# Altium PCB PCB8.PcbDoc (part 1 of 2)
Units mm, origin at the board's own origin, x right, y up, seen from the top; angles counter-clockwise.
Board outline 100 x 100 mm, 2 copper layers (Top Layer, Bottom Layer); 151 components, 157 nets, 624 pads, 195 vias.
Unrouted connection lines stored in the file: 31.
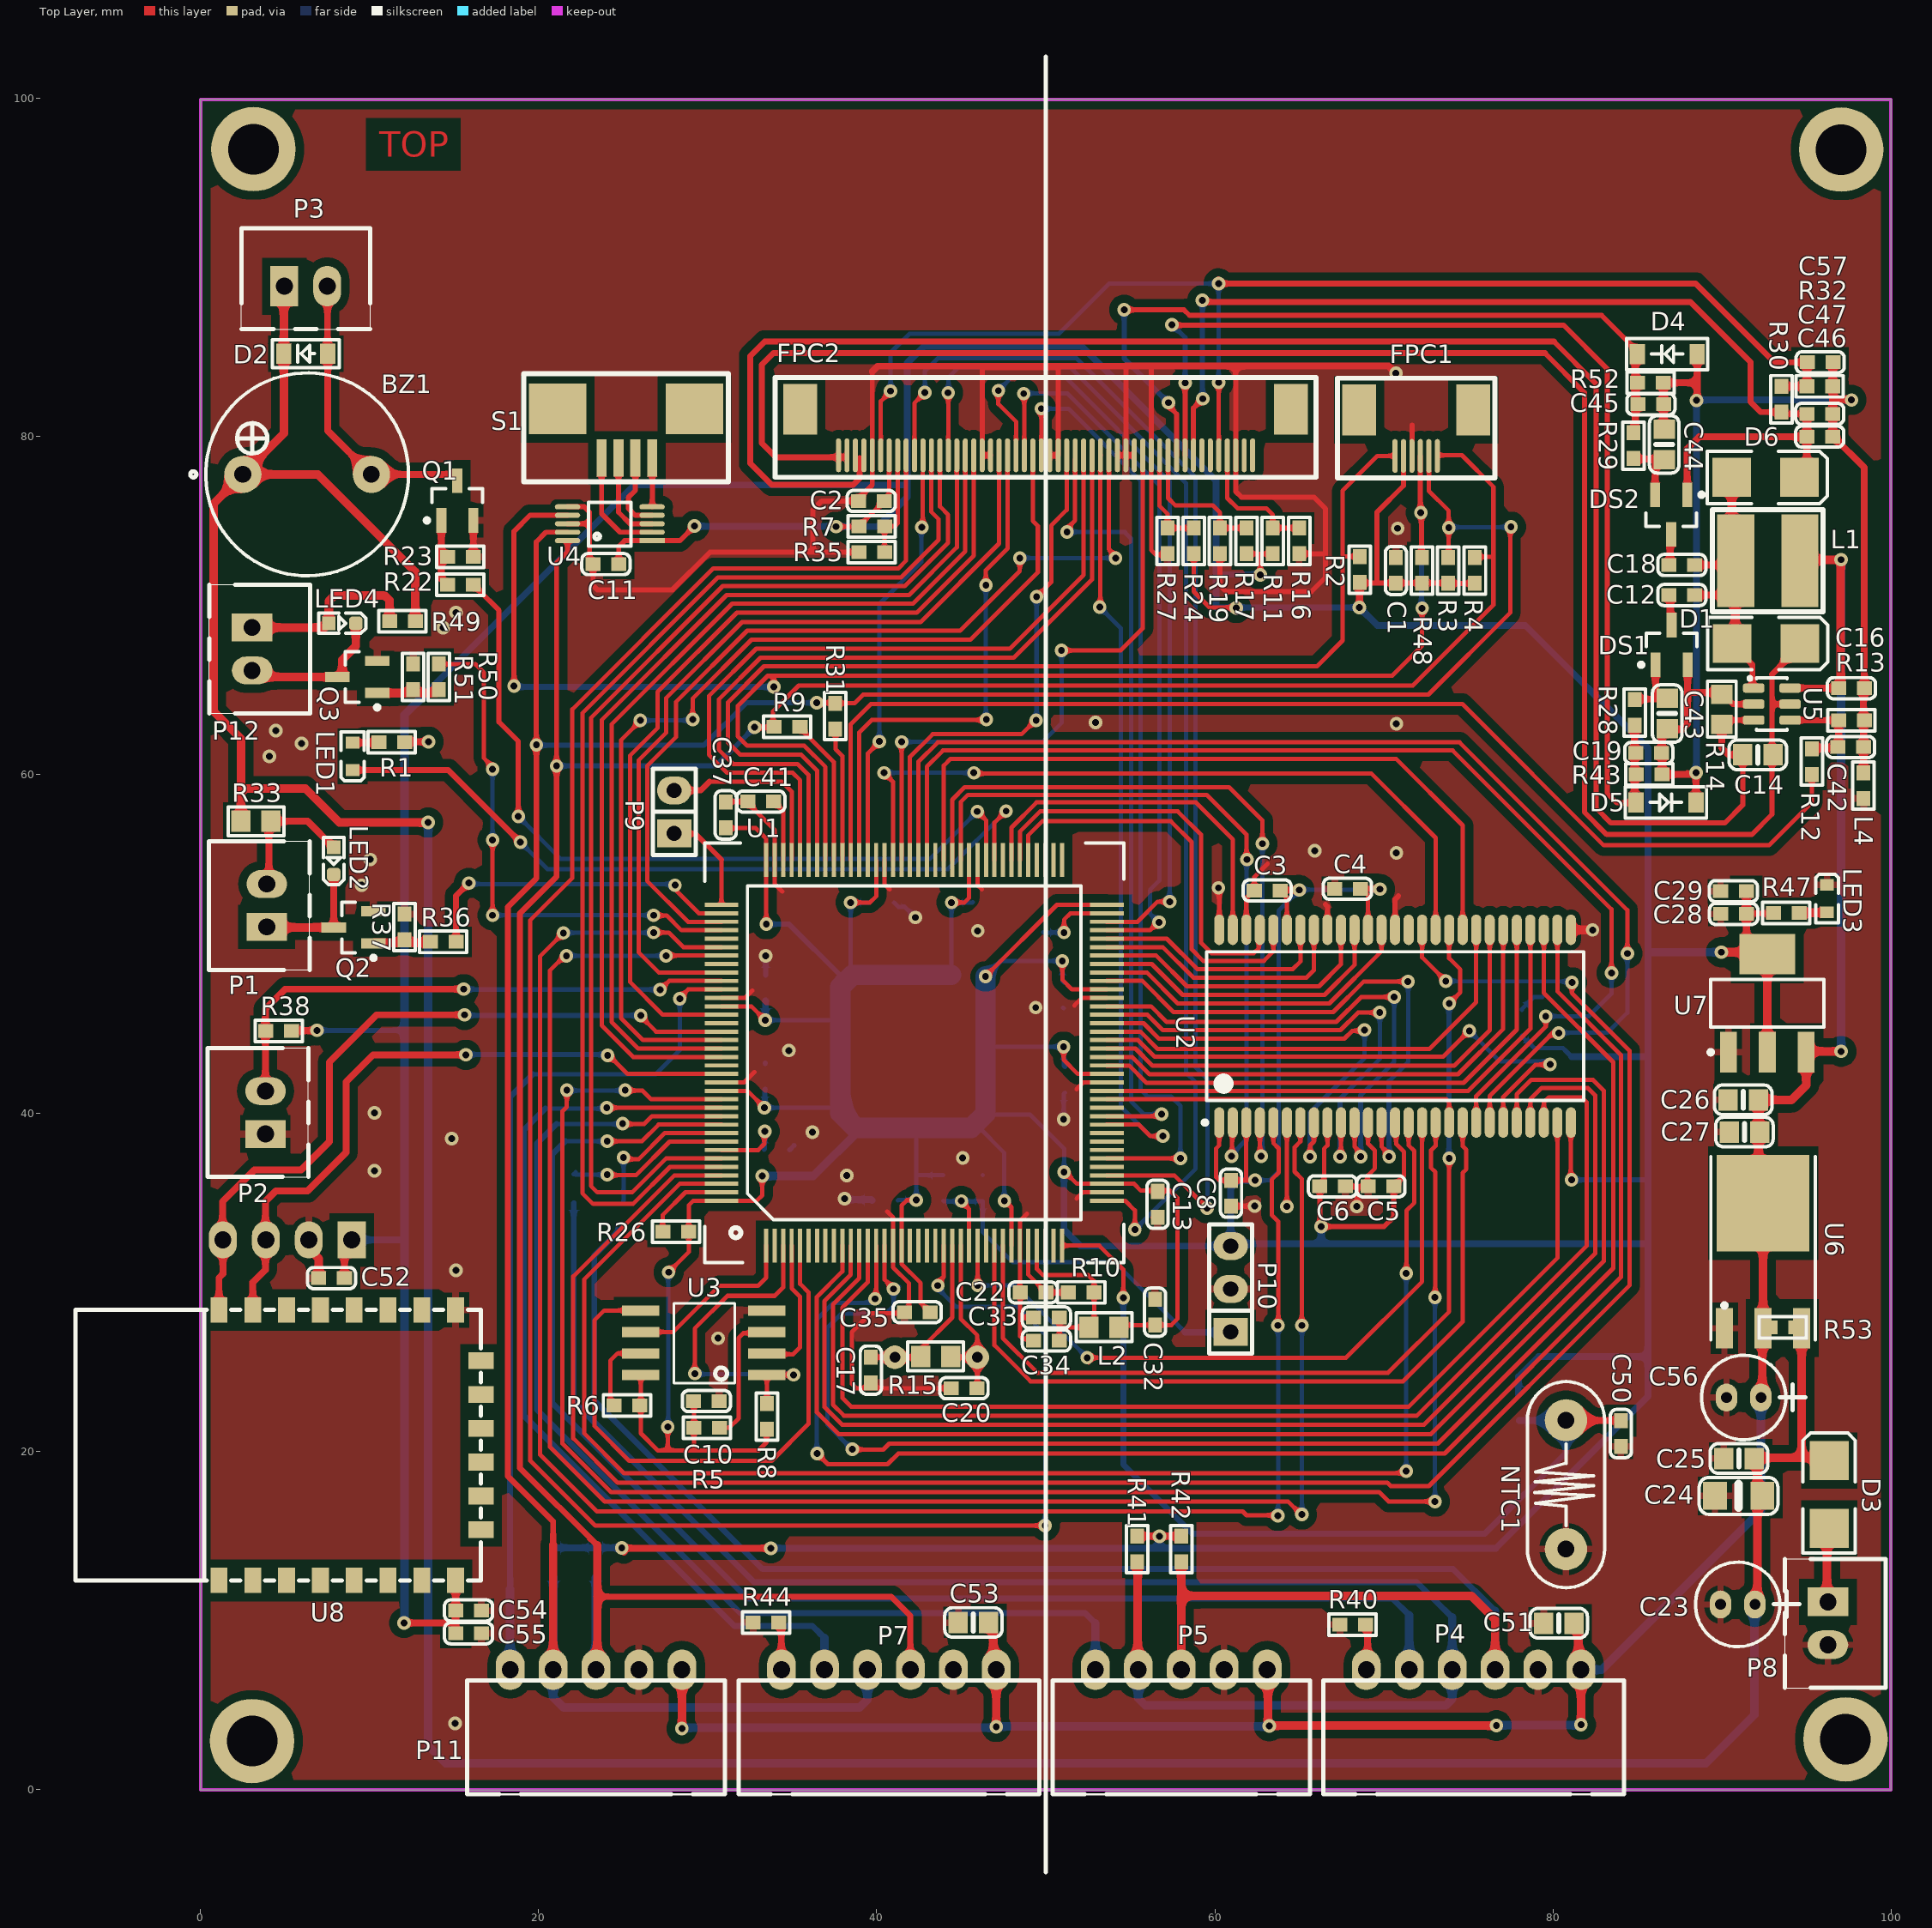
[diagram p0: Top Layer view]
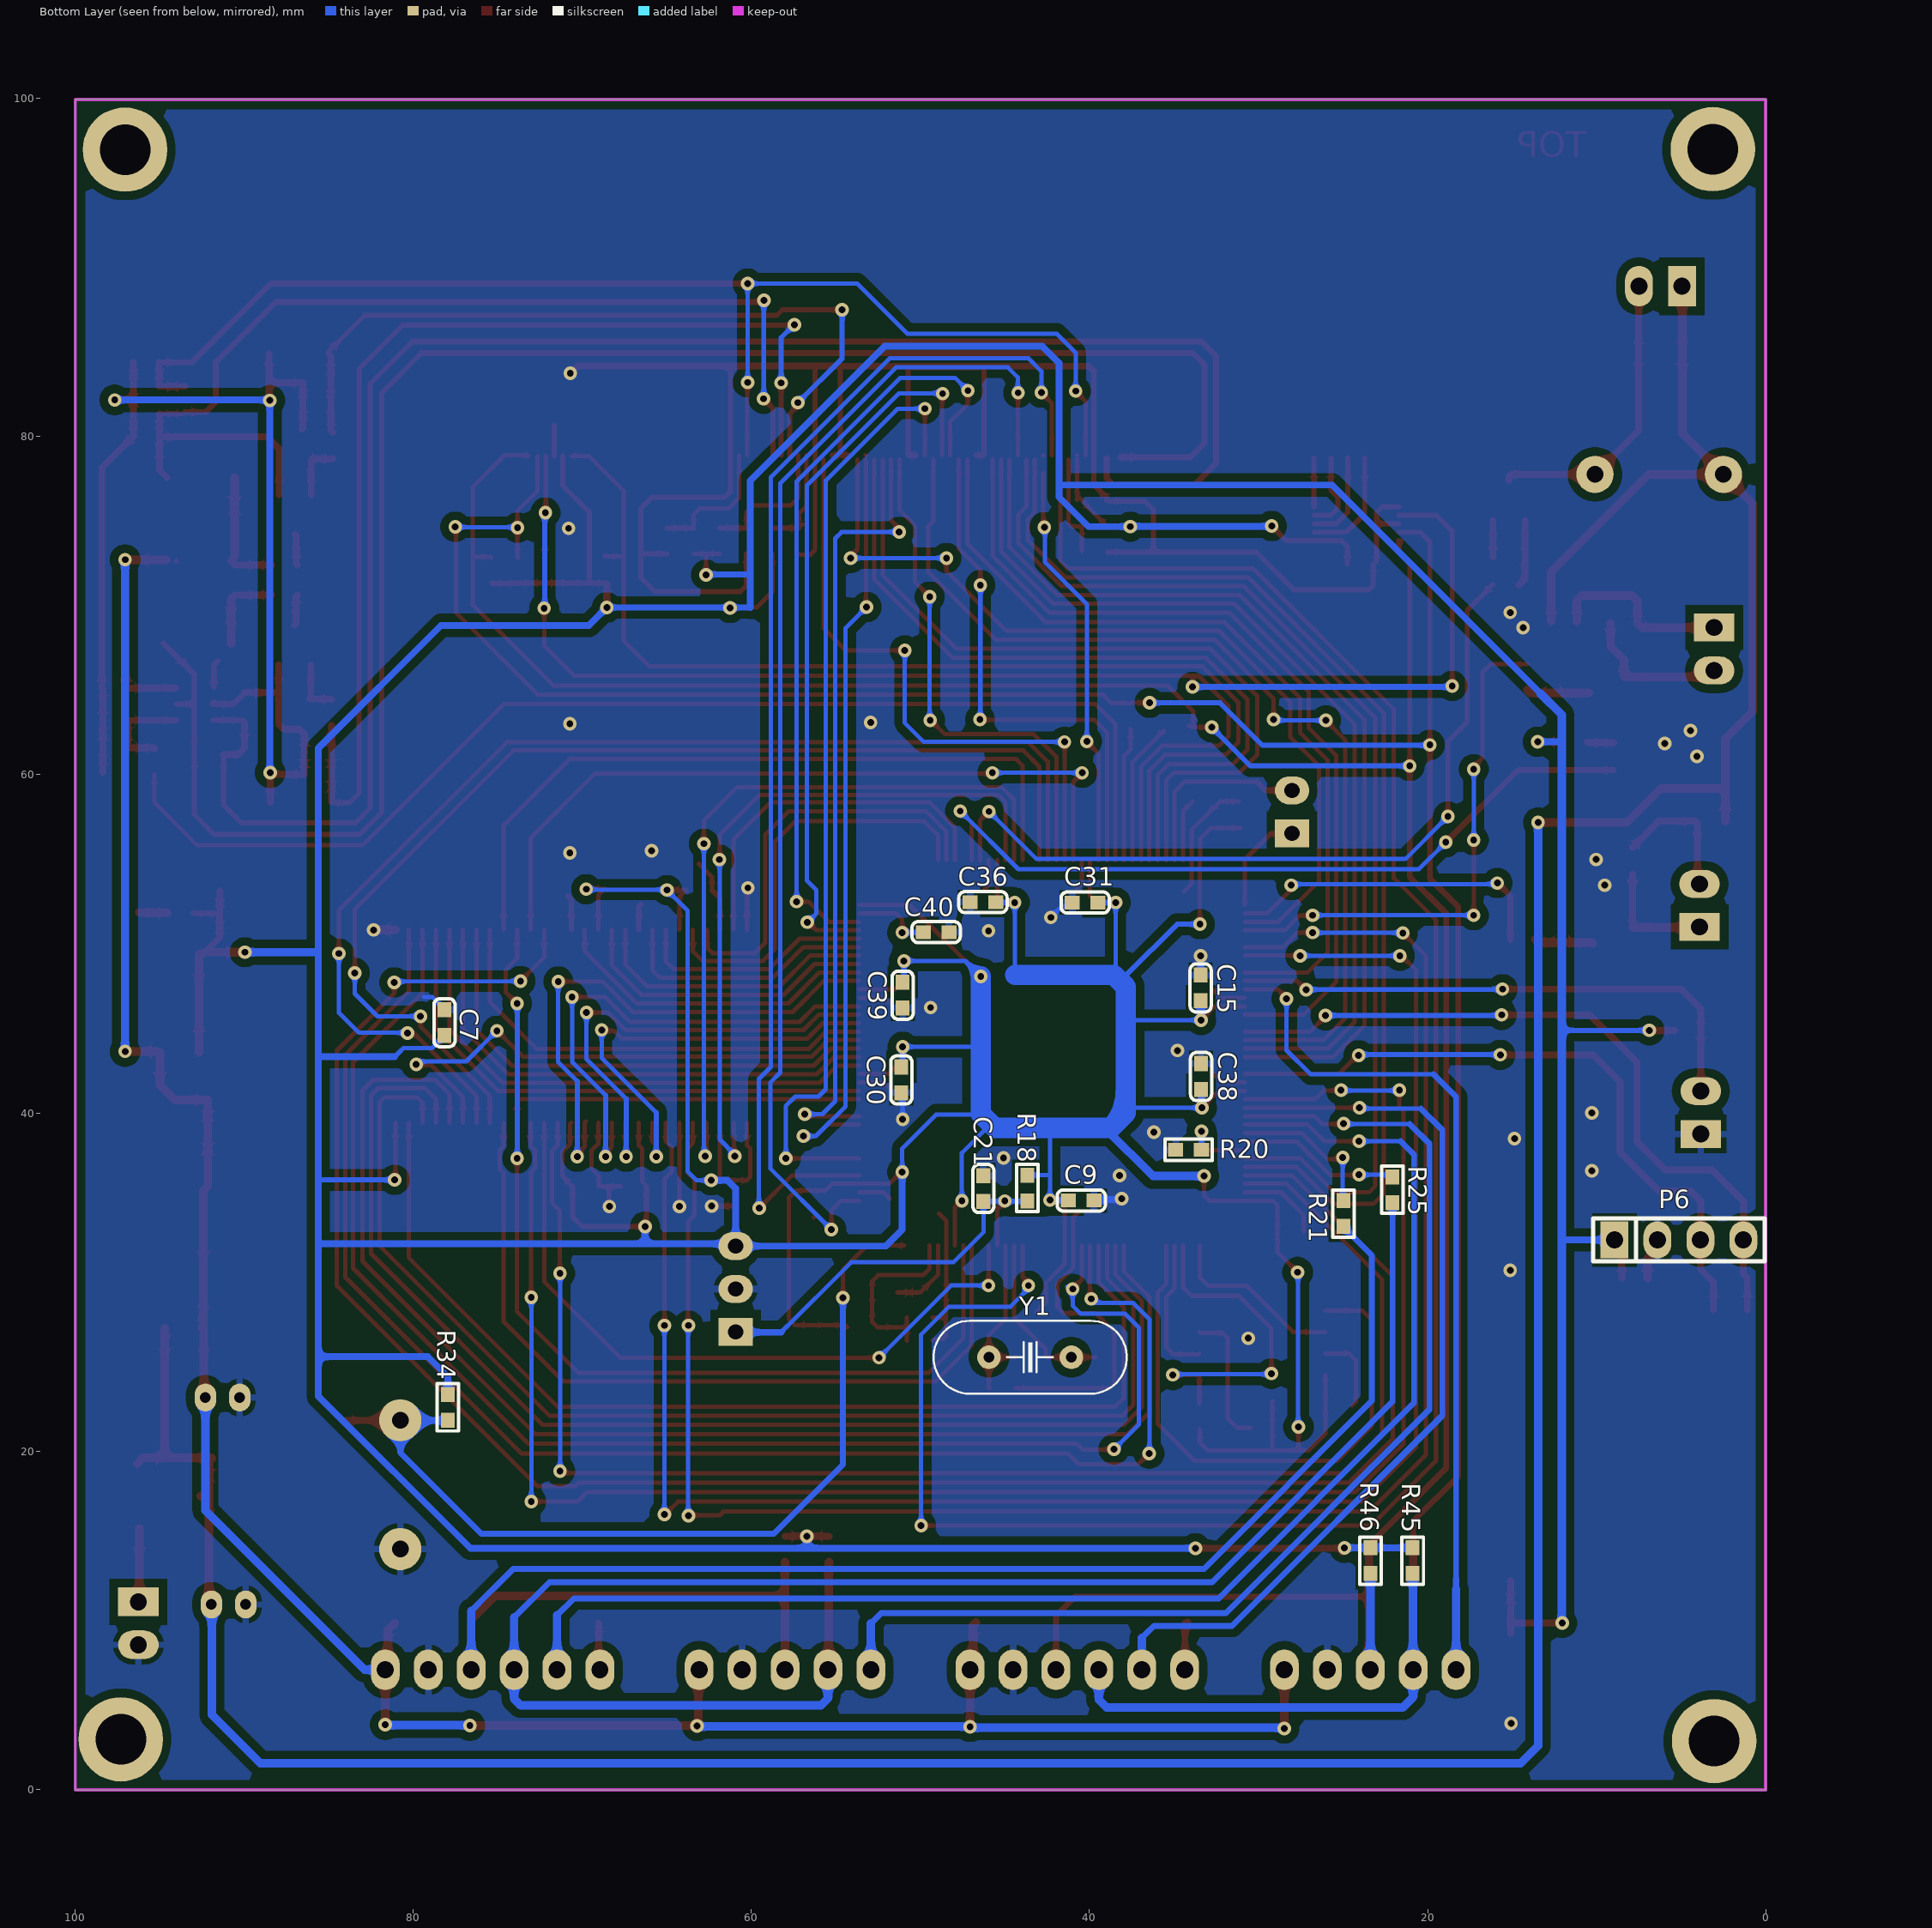
[diagram p1: Bottom Layer view, seen from below]
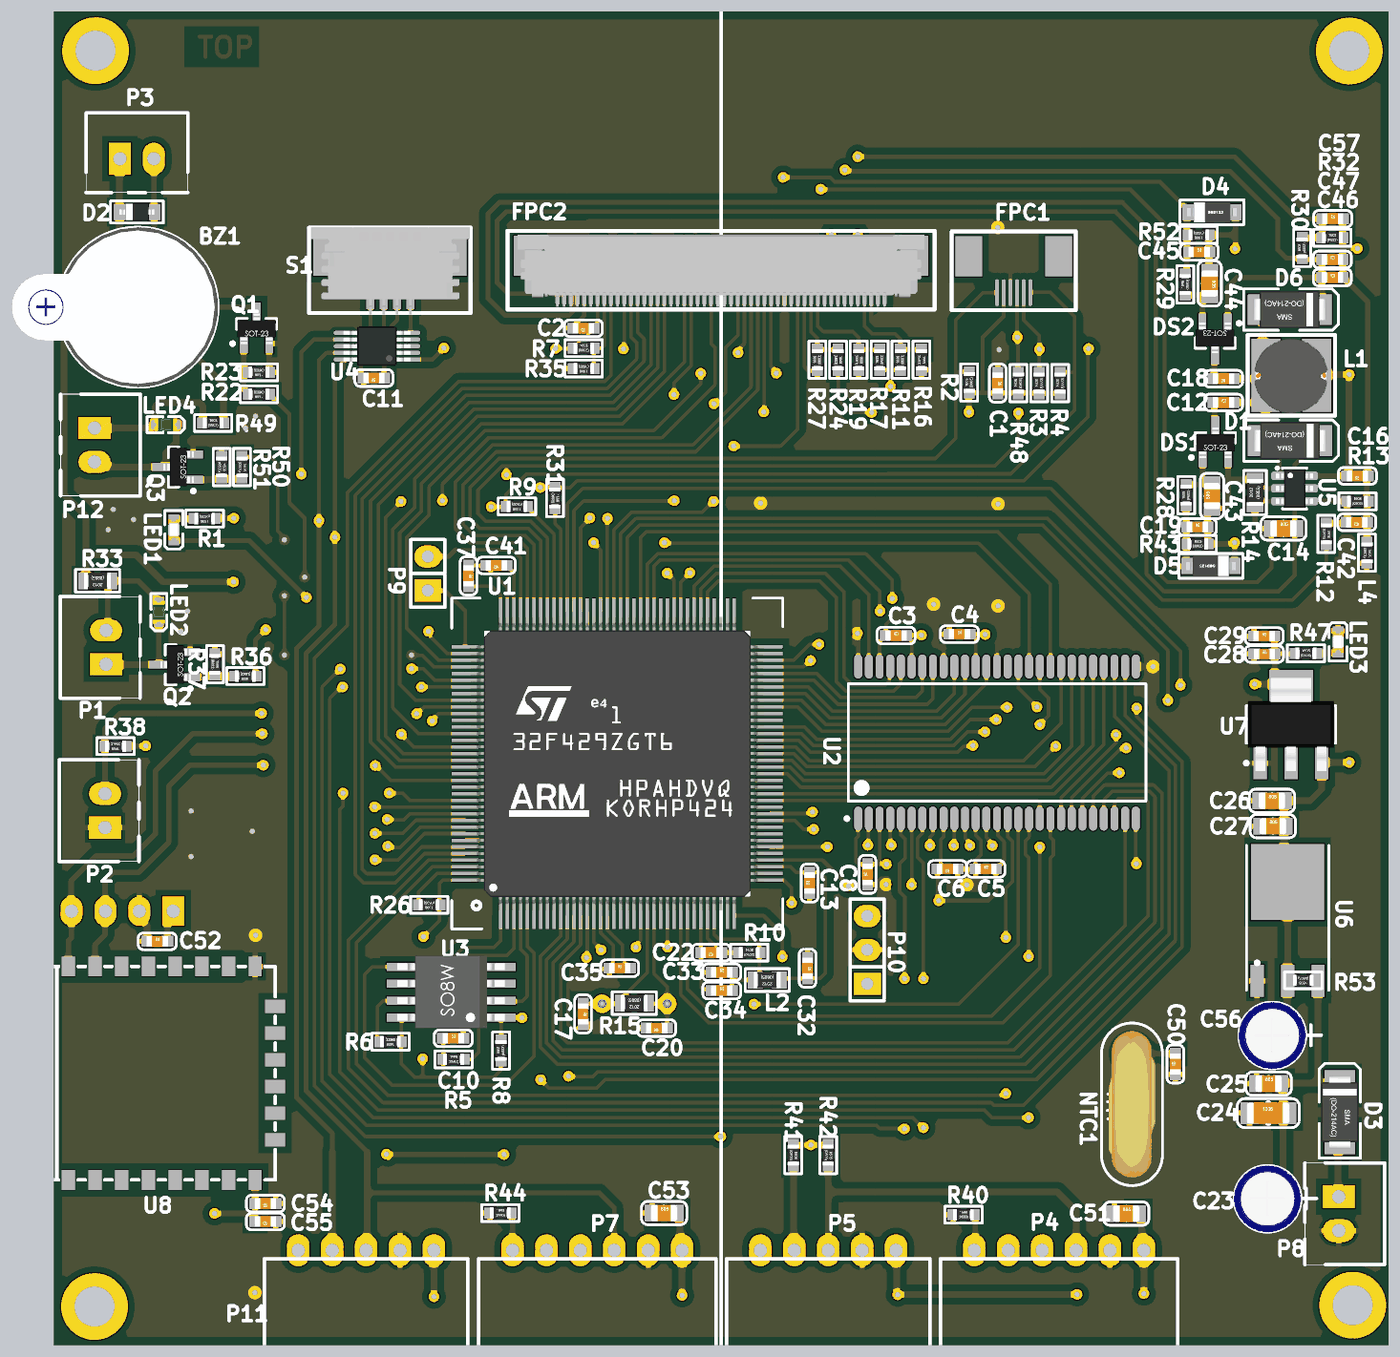
[diagram p3: 3D render of the assembled board from above, using the file's embedded part models]
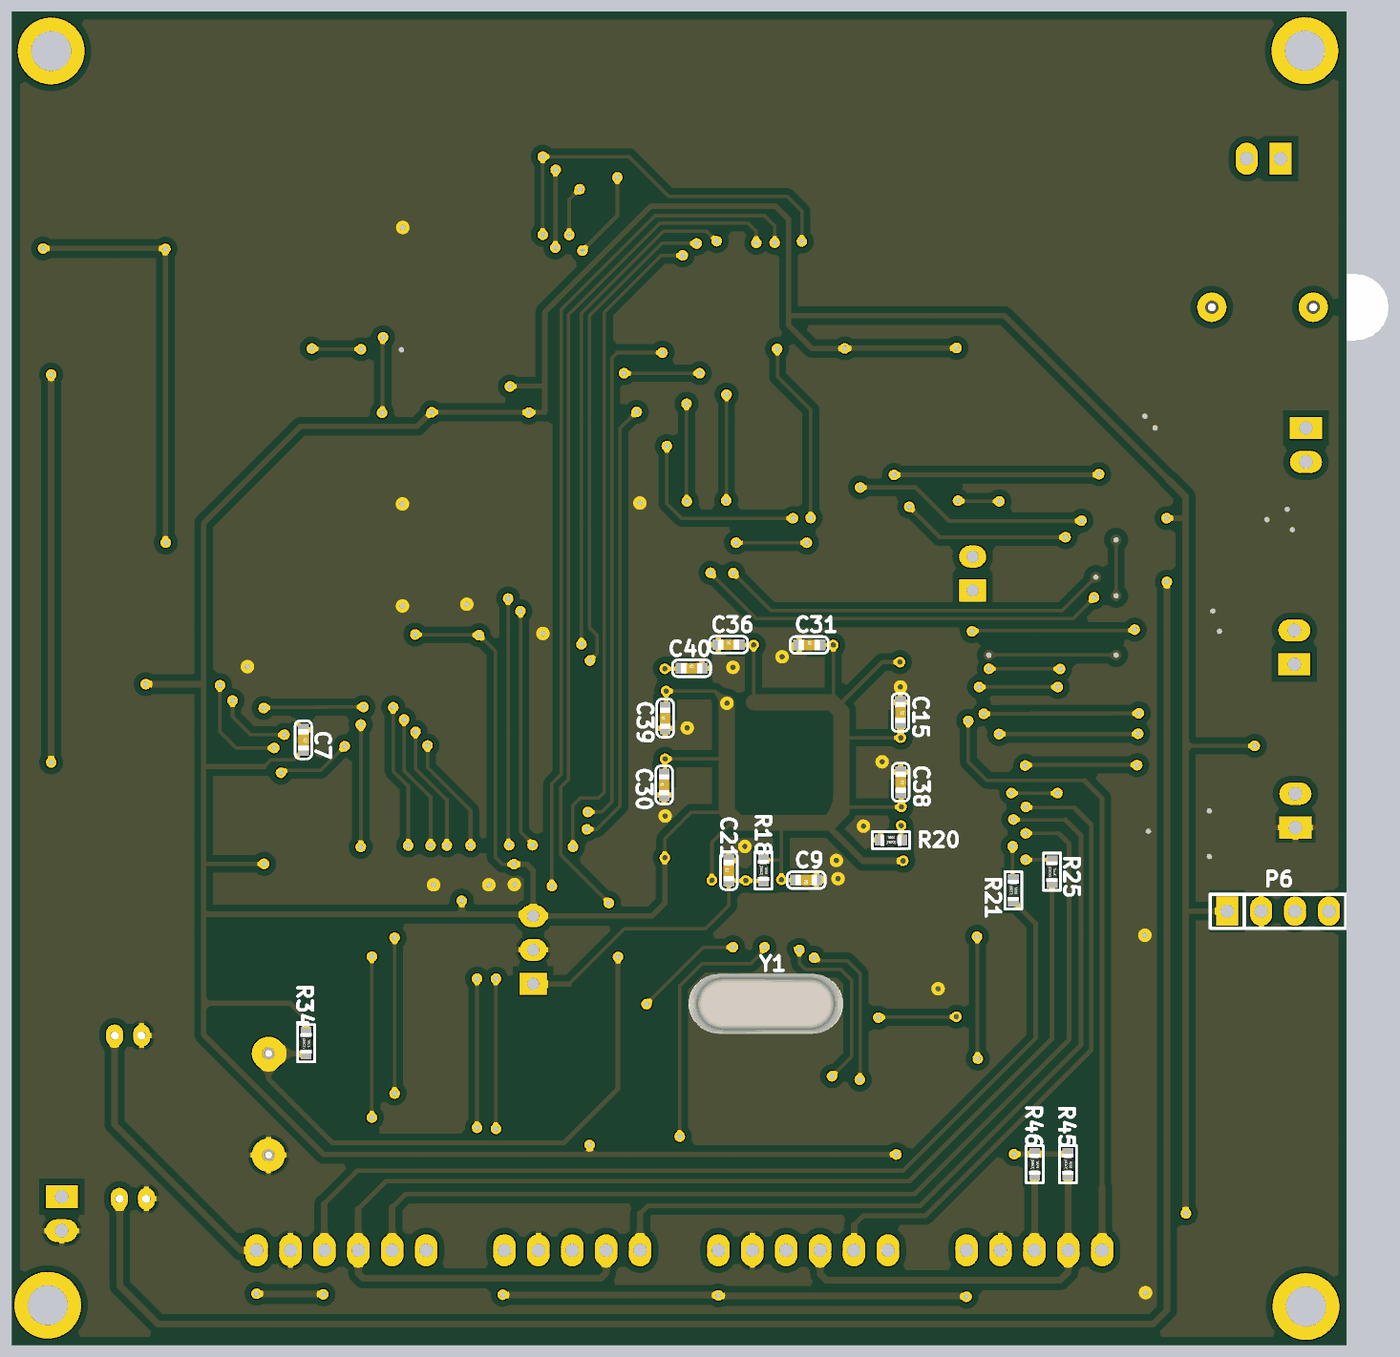
[diagram p4: 3D render of the assembled board from below, using the file's embedded part models]

## Layer stack, top to bottom
Top Solder: solder mask 0.0102, Solder Resist, Dk 3.5
Top Layer: signal copper 0.0356
Dielectric 1: dielectric 0.32, FR-4, Dk 4.8
Bottom Layer: signal copper 0.0356
Bottom Solder: solder mask 0.0102, Solder Resist, Dk 3.5

## Board outline
0,-0.051 100,-0.051 100,99.949 0,99.949

## Design rules (kind name [scope] priority, off if disabled: settings)
BoardOutlineClearance [All] p1: gap=0.5 ignorepadtopadclearanceinfootprint=FALSE
Clearance Clearance_1 [inpoly] p1: gap=0.5 ignorepadtopadclearanceinfootprint=FALSE
Clearance [All] p2: gap=0.2 ignorepadtopadclearanceinfootprint=FALSE
HoleSize [All] p1: absolutevalues=TRUE maxlimit=3 minlimit=0.025 maxpercent=80.000 minpercent=20.000
MinimumSolderMaskSliver [All] p1: minsoldermaskwidth=0.1
PolygonConnect [All] p1: thpad.connectstyle=Relief thpad.reliefconductorwidth=0.4 thpad.reliefentries=4 thpad.polygonreliefangle="90 Angle" thpad.airgapwidth=0.3 smdpad.connectstyle=Relief smdpad.reliefconductorwidth=0.4 smdpad.reliefentries=4 smdpad.polygonreliefangle="90 Angle" smdpad.airgapwidth=0.3 via.connectstyle=Direct via.reliefconductorwidth=0.254 via.reliefentries=4 via.polygonreliefangle="90 Angle" via.airgapwidth=0.254
RoutingVias [All] p1: holewidth=0.5 width=1 viastyle="Through Hole" minholewidth=0.3 minwidth=0.6 maxholewidth=0.711 maxwidth=1.27
SilkToSilkClearance [All] p1: silktosilkclearance=0
SilkToSolderMaskClearance [IsPad] p1: minsilkscreentomaskgap=0 clearancetoexposedcopper=TRUE
SolderMaskExpansion [All] p1: expansion=0.102 istentingtop=FALSE
SupplyNets "Schematic Supply Nets_11" [InNet('VREF+')] p1: voltage=0.000
SupplyNets "Schematic Supply Nets_10" [InNet('3V3')] p2: voltage=0.000
SupplyNets "Schematic Supply Nets_9" [InNet('VCOM')] p3: voltage=0.000
SupplyNets "Schematic Supply Nets_8" [InNet('12V')] p4: voltage=0.000
SupplyNets "Schematic Supply Nets_7" [InNet('VGL')] p5: voltage=0.000
SupplyNets "Schematic Supply Nets_5" [InNet('VGH')] p6: voltage=0.000
SupplyNets "Schematic Supply Nets_4" [InNet('+5V')] p7: voltage=0.000
SupplyNets "Schematic Supply Nets_3" [InNet('BGND')] p8: voltage=0.000
SupplyNets "Schematic Supply Nets_2" [InNet('GND')] p9: voltage=0.000
SupplyNets "Schematic Supply Nets_1" [InNet('VDDA')] p10: voltage=0.000
SupplyNets "Schematic Supply Nets" [InNet('AVDD')] p11: voltage=0.000
Width [All] p1: maxlimit=2 minlimit=0.254 preferedwidth=0.5 minimp=50.000000 maximp=50.000000 favimp=50.000000
26 further rules are at their usual default settings.

## Components (designator, comment, footprint, x,y, rotation, side; value= is the part's Value field where it differs from the comment)
BZ1 "Buzzer" "Buzzer 3M" 6.299,77.768 r90 top
C1 "100nF" "0603 Capacitor" 70.714,72.078 r270 top
C2 "4.7uF" "0603 Capacitor" 39.675,76.193 r180 top
C3 "100nF" "0603 Capacitor" 63.094,53.155 r0 top
C4 "100nF" "0603 Capacitor" 67.843,53.257 r0 top
C5 "100nF" "0603 Capacitor" 69.825,35.655 r0 top
C6 "100nF" "0603 Capacitor" 66.954,35.655 r180 top
C7 "100nF" "0603 Capacitor" 78.156,45.332 r270 bottom
C8 "100nF" "0603 Capacitor" 60.96,35.248 r90 top
C9 "100nF" "0603 Capacitor" 40.488,34.816 r0 bottom
C10 "100nF" "0603 Capacitor" 29.921,22.955 r0 top
C11 "100nF" "0603 Capacitor" 23.978,72.459 r180 top
C12 "100nF" "0603 Capacitor" 87.63,70.63 r0 top
C13 "100nF" "0603 Capacitor" 56.617,34.595 r90 top
C14 "2.2uF" "0805 Capacitor" 92.126,61.182 r0 top
C15 "100nF" "0603 Capacitor" 33.426,47.389 r270 bottom
C16 "4.7uF" "0603 Capacitor" 97.663,65.119 r180 top
C17 "22pF" "0603 Capacitor" 39.649,24.783 r270 top
C18 "100nF" "0603 Capacitor" 87.63,72.408 r180 top
C19 "100nF" "0603 Capacitor" 85.674,61.29 r0 top
C20 "22pF" "0603 Capacitor" 45.161,23.717 r180 top
C21 "100nF" "0603 Capacitor" 46.279,35.528 r90 bottom
C22 "100nF" "0603 Capacitor" 49.251,29.381 r180 top
C23 "220uf/16v" $CAP-RB-80MIL-D5MM 90.932,10.922 r180 top
C24 "10uF" "1206 Capacitor" 90.983,17.348 r0 top
C25 "100nF" "0805 Capacitor" 91.008,19.558 r0 top
C26 "10uF" "0805 Capacitor" 91.262,40.767 r0 top
C27 "100nF" "0805 Capacitor" 91.327,38.862 r0 top
C28 "10uF" "0603 Capacitor" 90.692,51.765 r0 top
C29 "100nF" "0603 Capacitor" 90.678,53.111 r0 top
C30 "100nF" "0603 Capacitor" 51.13,41.954 r90 bottom
C31 "100nF" "0603 Capacitor" 40.259,52.444 r180 bottom
C32 "100nF" "0603 Capacitor" 56.464,28.212 r270 top
C33 "100nF" "0603 Capacitor" 50.038,27.908 r0 top
C34 "1uF" "0603 Capacitor" 50.038,26.536 r0 top
C35 "100nF" "0603 Capacitor" 42.393,28.212 r0 top
C36 "100nF" "0603 Capacitor" 46.304,52.469 r180 bottom
C37 "100nF" "0603 Capacitor" 31.064,57.626 r270 top
C38 "100nF" "0603 Capacitor" 33.401,42.157 r270 bottom
C39 "100nF" "0603 Capacitor" 51.054,46.958 r90 bottom
C40 "2.2uF" "0603 Capacitor" 49.073,50.691 r180 bottom
C41 "2.2uF" "0603 Capacitor" 33.147,58.413 r180 top
C42 "NC|82nF" "0603 Capacitor" 97.612,61.639 r180 top value=NC|82nF
C43 "1uF" "0805 Capacitor" 86.766,63.616 r90 top
C44 "1uF" "0805 Capacitor" 86.589,79.546 r270 top
C45 "100nF" "0603 Capacitor" 85.801,81.915 r0 top
C46 "2.2uF" "0603 Capacitor" 95.783,80.003 r0 top
C47 "100nF" "0603 Capacitor" 95.783,81.349 r0 top
C50 "100nF" "0603 Capacitor" 84.023,21.031 r90 top
C51 "10uF" "0805 Capacitor" 80.34,9.814 r0 top
C52 "100nF" "0603 Capacitor" 7.747,30.226 r0 top
C53 "10uF" "0805 Capacitor" 45.72,9.855 r0 top
C54 "100nF" "0603 Capacitor" 15.85,10.566 r180 top
C55 "10uF" "0603 Capacitor" 15.85,9.22 r180 top
C56 "220uf/16v" $CAP-RB-80MIL-D5MM 91.288,23.165 r180 top
C57 "100nF" "0603 Capacitor" 95.809,84.397 r0 top
D1 "1N5819" DO-214AC(SMA) 92.608,67.76 r270 top
D2 "1N4148" SOD-323 6.223,84.905 r0 top
D3 "1N5819" DO-214AC(SMA) 96.342,17.424 r0 top
D4 "Zener 16.8V" SOD-123 86.763,84.887 r0 top
D5 "Zener 6.8V" SOD-123 86.69,58.369 r180 top
D6 "1N5819" DO-214AC(SMA) 92.583,77.59 r270 top
DS1 "BAT54S" SOT-23 87.02,67.677 r0 top
DS2 "BAT54S" SOT-23 86.995,75.387 r180 top
FPC1 "FPC 6 Pin 0.5mm Pitch" "FPC 6 Pin 0.5mm Pitch" 71.912,80.217 r0 top
FPC2 "FPC 50 Pin 0.5 mm Pitch" "FPC 50 Pin 0.5 mm Top Contact" 49.987,80.257 r0 top locked
L1 "4.7uH/1.5A/DCR<0.1R/CD54" CD54 92.71,72.662 r180 top
L2 "10uH" "0805 Resistor" 53.442,27.323 r180 top
L4 "10uH" "0603 Resistor" 98.374,59.353 r270 top
LED1 "SMD LED" "LED_0603 W" 8.992,61.087 r270 top
LED2 "5mm" LED0603 7.874,54.902 r270 top
LED3 "SMD LED" "LED_0603 W" 96.215,52.68 r90 top
LED4 "5mm" LED0603 8.382,68.961 r0 top
NTC1 "50R" "$RES-NTC-POWER 15mm" 80.772,18.009 r90 top
P1 "J2" "$xh-2pin male-L"#1 3.912,50.996 r90 top
P2 "J2" "$xh-2pin male-L"#1 3.835,38.753 r90 top
P3 "J2" "$xh-2pin male-L"#1 4.953,88.9 r0 top
P4 "Header 6" "$xh-6pin male-H" 68.961,7.061 r0 top
P5 "Header 5" "$xh-5pin male-H" 52.934,7.061 r0 top
P6 "PL2303" $Header4Female 8.941,32.487 r180 bottom
P7 "Header 6" "$xh-6pin male-H" 34.366,7.061 r0 top
P8 "J2" "$xh-2pin male-L"#2 96.266,11.074 r270 top
P9 "J2" $HEADER2FEMALE 28.016,56.533 r90 top
P10 "J3" $HEADER3FEMALE 60.935,27.044 r90 top
P11 "Header 5" "$xh-5pin male-H" 18.313,7.061 r0 top
P12 "J2" "$xh-2pin male-L"#1 3.048,68.707 r270 top
Q1 "PMBT3904" SOT-23 15.189,76.218 r0 top
Q2 "PMBT3904" SOT-23 9.049,50.971 r90 top
Q3 "PMBT3904" SOT-23 9.271,65.786 r90 top
R1 "470" "0603 Resistor" 11.303,61.925 r180 top
R2 "4.7K" "0603 Resistor" 68.58,72.129 r90 top
R3 "4.7K" "0603 Resistor" 73.812,72.078 r90 top
R4 "4.7K" "0603 Resistor" 75.387,72.078 r90 top
R5 "4.7K" "0603 Resistor" 29.947,21.38 r0 top
R6 "4.7K" "0603 Resistor" 25.222,22.701 r180 top
R7 "10K" "0603 Resistor" 39.7,74.694 r0 top
R8 "4.7K" "0603 Resistor" 33.503,22.04 r90 top
R9 "100" "0603 Resistor" 34.696,62.833 r180 top
R10 "47" "0603 Resistor" 52.095,29.381 r0 top
R11 "10K" "0603 Resistor" 63.424,73.831 r90 top
R12 "0|10K" "0603 Resistor" 95.326,60.775 r270 top value=0|10K
R13 "100K" "0603 Resistor" 97.663,63.214 r0 top
R14 "2.7(1.1-5.1)" "0805 Resistor" 89.992,63.874 r90 top
R15 "1M" "0805 Resistor" 43.485,25.596 r180 top
R16 "10K" "0603 Resistor" 64.999,73.831 r270 top
R17 "10K" "0603 Resistor" 61.874,73.831 r90 top
R18 "4.7K" "0603 Resistor" 43.688,35.553 r270 bottom
R19 "10K" "0603 Resistor" 60.3,73.831 r270 top
R20 "10K" "0603 Resistor" 34.138,37.814 r180 bottom
R21 "100" "0603 Resistor" 24.968,34.044 r270 bottom
R22 "4.7K" "0603 Resistor" 15.367,71.247 r180 top
R23 "47K" "0603 Resistor" 15.367,72.891 r180 top
R24 "10K" "0603 Resistor" 58.75,73.831 r270 top
R25 "100" "0603 Resistor" 22.073,35.451 r270 bottom
R26 "10K" "0603 Resistor" 28.118,32.962 r180 top
R27 "10K" "0603 Resistor" 57.201,73.831 r90 top
R28 "1K" "0603 Resistor" 84.836,63.678 r90 top
R29 "1K" "0603 Resistor" 84.76,79.47 r90 top
R30 "4.7K" "0603 Resistor" 93.523,82.213 r90 top
R31 "100" "0603 Resistor" 37.541,63.468 r270 top
R32 "3.3K" "0603 Resistor" 95.783,82.975 r0 top
R33 "680" "0805 Resistor" 3.277,57.252 r180 top
R34 "4.7K" "0603 Resistor" 77.953,22.581 r270 bottom
R35 "10K" "0603 Resistor" 39.7,73.17 r180 top
R36 "4.7K" "0603 Resistor" 14.351,50.114 r180 top
R37 "47K" "0603 Resistor" 12.065,50.996 r270 top
R38 "4.7K" "0603 Resistor" 4.623,44.856 r180 top
R40 "0" "0603 Resistor" 68.148,9.728 r0 top
R41 "4.7K" "0603 Resistor" 55.397,14.199 r270 top
R42 "4.7K" "0603 Resistor" 58.014,14.199 r270 top
R43 "52K" "0603 Resistor" 85.7,60.02 r0 top
R44 "0" "0603 Resistor" 33.45,9.855 r0 top
R45 "4.7K" "0603 Resistor" 20.879,13.513 r270 bottom
R46 "4.7K" "0603 Resistor" 23.368,13.513 r270 bottom
R47 "470" "0603 Resistor" 93.802,51.816 r0 top
R48 "4.7K" "0603 Resistor" 72.263,72.078 r90 top
R49 "680" "0603 Resistor" 11.938,69.088 r0 top
R50 "4.7K" "0603 Resistor" 14.097,65.786 r270 top
R51 "47K" "0603 Resistor" 12.573,65.786 r270 top
R52 "52K" "0603 Resistor" 85.776,83.185 r180 top
R53 "NA" "0603 Resistor" 93.599,27.305 r180 top
S1 "1mm FPC" "FPC 4 Pin 0.5mm" 25.171,80.183 r0 top
U1 "STM32F429ZGT6" LQFP-144 42.215,43.554 r0 top locked
U2 "MT48LC16M16A2P-75" TSOP2-54_M 70.663,45.129 r90 top locked
U3 "W25Q32" SOIC-8W 29.769,26.409 r180 top
U4 "NS2009" MSOP-10 24.206,74.847 r180 top
U5 "AP3031|MP3202" SOT23-6 92.956,64.179 r0 top
U6 "LM1117IMP-5.0" SOT-223&TO-252 92.431,30.582 r0 top
U7 "LM1117IMP-5.0" SOT-223N 92.685,46.486 r0 top
U8 "PB-03F" PB-03F 8.836,20.343 r90 top value=RF
Y1 "8MHz" "Xtal 2p" 43.51,25.545 r180 bottom

## Footprints (in the part's own frame and the unit in brackets; to place one, negate y for a bottom-side part, rotate by r counter-clockwise, add the part's x,y. Pads: shape width x height; smd on the part's side, far side on the other; paste and mask are expansions set on the pad)
"0603 Capacitor" [mil]
  rect 35x32 smd: 1(-29.99,0.01) 2(30.01,0.01)
  silkscreen extent -56,-25 56,25, body extent -31,-16 32,16, height 12
"0603 Resistor" [mil]
  rect 35x32 smd: 1(-30,0) 2(30,0)
  silkscreen extent -55,-25 55,25, body extent -31,-17 31,17, height 18
"0805 Capacitor" [mm]
  rect 1.143x1.27 smd: 1(-0.9,0) 2(0.9,0)
  silkscreen extent -1.7,-0.87 1.7,0.87, body extent -1,-0.62 1,0.63, height 0.78
"0805 Resistor" [mil]
  rect 45x50 smd: 1(-35,0) 2(35,0)
  silkscreen extent -65,-33 65,33, body extent -39,-25 39,25, height 18
"1206 Capacitor" [mil]
  rect 55x65 smd: 1(-55,0) 2(55,0)
  silkscreen extent -92,-43 92,43, body extent -63,-31 63,31, height 39
$CAP-RB-80MIL-D5MM [mil]
  oval 50x65 hole 25: 1(-40,0) 2(40,0)
  silkscreen extent -144,-98 98,98, body extent -99,-99 99,99, height 446
$HEADER2FEMALE [mil]
  rect 65x80 hole 35.43: 1(0,0)
  oval 65x80 hole 35.43: 2(100,0)
  silkscreen extent -50,-50 150,50, body extent -50,-50 150,50, height 350
$HEADER3FEMALE [mil]
  rect 65x80 hole 35.43: 1(0,0)
  oval 65x80 hole 35.43: 2(100,0) 3(200,0)
  silkscreen extent -50,-50 250,50, body extent -50,-50 250,50, height 350
$Header4Female [mm]
  rect 1.65x2.2 hole 1: 1(0,0)
  oval 1.65x2.2 hole 1: 2(2.54,0) 3(5.08,0) 4(7.62,0)
  silkscreen extent -1.27,-1.27 8.89,1.27, body extent -1.27,-1.27 8.89,1.27, height 8.89
"$RES-NTC-POWER 15mm" [mm]
  round 2.5 hole 1: 1(-3.81,0) 2(3.81,0)
  silkscreen extent -6.1,-2.29 6.1,2.29, body extent -5.5,-1.76 5.5,1.75, height 11.49
"$xh-2pin male-L"#1 [mm]
  rect 1.651x2.4 hole 1: 1(0,0)
  oval 1.651x2.4 hole 1: 2(2.54,0)
  silkscreen extent -2.54,-2.54 5.08,3.43, body extent -2.54,-2.54 5.08,3.43, height 7.5
"$xh-2pin male-L"#2 [mm]
  rect 1.7x2.4 hole 1: 1(0,0)
  oval 1.7x2.4 hole 1: 2(2.54,0)
  silkscreen extent -2.54,-2.54 5.08,3.43, body extent -2.54,-2.54 5.08,3.43, height 7.5
"$xh-5pin male-H" [mm]
  oval 1.7x2.4 hole 1: 1(0,0) 2(2.54,0) 3(5.08,0) 4(7.62,0) 5(10.16,0)
  silkscreen extent -2.54,-7.37 12.7,-0.63, body extent -2.44,-7.37 12.7,0.3, height 5.7
"$xh-6pin male-H" [mm]
  oval 1.7x2.4 hole 1: 1(0,0) 2(2.54,0) 3(5.08,0) 4(7.62,0) 5(10.16,0) 6(12.7,0)
  silkscreen extent -2.54,-7.37 15.24,-0.63, body extent -2.44,-7.37 15.24,0.3, height 5.7
"Buzzer 3M" [mm]
  round 2.2 hole 1: 1(0,3.8) 2(0,-3.8)
  silkscreen extent -6,-6 6,6.91, body extent -6,-6 6,9.45, height 9.65
CD54 [mm]
  rect 2.2x5.5 smd: 1(-1.9,0) 2(1.9,0)
  silkscreen extent -3.27,-3.03 3.28,3.03, body extent -2.73,-2.75 2.78,2.85, height 4.55
DO-214AC(SMA) [mm]
  rect 2.3x2.3 smd: 1(0,-2.003) 2(0,2.003)
  silkscreen extent -1.55,-3.45 1.55,3.65, body extent -1.4,-2.75 1.4,2.75, height 2.6
"FPC 4 Pin 0.5mm" [mm]
  rect 0.6x2.2 smd: 1(-1.45,-1.45) 2(-0.45,-1.45) 3(0.55,-1.45) 4(1.55,-1.45)
  rect 3.4x3 smd: 5(4.05,1.45) 6(-4.05,1.45)
  silkscreen extent -6.05,-2.85 6.05,3.55, body extent -5.91,-2.96 6.01,3.59, height 2.51
"FPC 6 Pin 0.5mm Pitch" [mm]
  oval 0.3x2 smd mask+0.04: 1(-1.251,-1.361) 2(-0.751,-1.361) 3(-0.251,-1.361) 4(0.249,-1.361) 5(0.749,-1.361) 6(1.249,-1.361)
  rect 2x3 smd: ""(-3.374,1.361) ""(3.374,1.361)
  silkscreen extent -4.65,-2.66 4.65,3.24
"FPC 50 Pin 0.5 mm Top Contact" [mm]
  oval 0.3x2 smd mask+0.04: 1(-12.251,-1.361) 2(-11.751,-1.361) 3(-11.251,-1.361) 4(-10.751,-1.361) 5(-10.251,-1.361) 6(-9.751,-1.361) 7(-9.251,-1.361) 8(-8.751,-1.361) 9(-8.251,-1.361) 10(-7.751,-1.361) 11(-7.251,-1.361) 12(-6.751,-1.361) 13(-6.251,-1.361) 14(-5.751,-1.361) 15(-5.251,-1.361) 16(-4.751,-1.361) 17(-4.251,-1.361) 18(-3.751,-1.361) 19(-3.251,-1.361) 20(-2.751,-1.361) 21(-2.251,-1.361) 22(-1.751,-1.361) 23(-1.251,-1.361) 24(-0.751,-1.361) 26(0.249,-1.361) 27(0.749,-1.361) 28(1.249,-1.361) 29(1.749,-1.361) 30(2.249,-1.361) 31(2.749,-1.361) 32(3.249,-1.361) 33(3.749,-1.361) 34(4.249,-1.361) 35(4.749,-1.361) 36(5.249,-1.361) 37(5.749,-1.361) 38(6.249,-1.361) 39(6.749,-1.361) 40(7.249,-1.361) 41(7.749,-1.361) 42(8.249,-1.361) 43(8.749,-1.361) 44(9.249,-1.361) 45(9.749,-1.361) 46(10.249,-1.361) 47(10.749,-1.361) 48(11.249,-1.361) 49(11.749,-1.361) 50(12.249,-1.361)
  oval 0.3x2 smd paste+0 mask+0.04: 25(-0.251,-1.361)
  rect 2x3 smd: 51(14.524,1.361) 52(-14.524,1.361)
  silkscreen extent -16,-2.66 16,3.24, body extent -15.25,-2.45 15.25,2.95, height 2.02
LED0603 [mm] "LED SMD 0603"
  rect 0.8x0.8 smd paste-5 mask+0.075: 1(-0.8,0)
  rrect50% 0.8x0.8 smd paste-5 mask+0.075: 2(0.8,0)
  silkscreen extent -1.4,-0.6 1.4,0.6, body extent -0.85,-0.45 0.85,0.45, height 0.9
"LED_0603 W" [mm]
  rect 0.7x0.8 smd: 1(-0.813,0) 2(0.813,0)
  silkscreen extent -1.44,-0.67 1.44,0.67, body extent -0.8,-0.4 0.8,0.4, height 0.6
LQFP-144 [mm]
  rect 0.25x2 smd mask+0.05: 1(-8.75,-11.4) 2(-8.25,-11.4) 3(-7.75,-11.4) 4(-7.25,-11.4) 5(-6.75,-11.4) 6(-6.25,-11.4) 7(-5.75,-11.4) 8(-5.25,-11.4) 9(-4.75,-11.4) 10(-4.25,-11.4) 11(-3.75,-11.4) 12(-3.25,-11.4) 13(-2.75,-11.4) 14(-2.25,-11.4) 15(-1.75,-11.4) 16(-1.25,-11.4) 17(-0.75,-11.4) 18(-0.25,-11.4) 19(0.25,-11.4) 20(0.75,-11.4) 21(1.25,-11.4) 22(1.75,-11.4) 23(2.25,-11.4) 24(2.75,-11.4) 25(3.25,-11.4) 26(3.75,-11.4) 27(4.25,-11.4) 28(4.75,-11.4) 29(5.25,-11.4) 30(5.75,-11.4) 31(6.25,-11.4) 32(6.75,-11.4) 33(7.25,-11.4) 34(7.75,-11.4) 35(8.25,-11.4) 36(8.75,-11.4) 73(8.75,11.4) 74(8.25,11.4) 75(7.75,11.4) 76(7.25,11.4) 77(6.75,11.4) 78(6.25,11.4) 79(5.75,11.4) 80(5.25,11.4) 81(4.75,11.4) 82(4.25,11.4) 83(3.75,11.4) 84(3.25,11.4) 85(2.75,11.4) 86(2.25,11.4) 87(1.75,11.4) 88(1.25,11.4) 89(0.75,11.4) 90(0.25,11.4) 91(-0.25,11.4) 92(-0.75,11.4) 93(-1.25,11.4) 94(-1.75,11.4) 95(-2.25,11.4) 96(-2.75,11.4) 97(-3.25,11.4) 98(-3.75,11.4) 99(-4.25,11.4) 100(-4.75,11.4) 101(-5.25,11.4) 102(-5.75,11.4) 103(-6.25,11.4) 104(-6.75,11.4) 105(-7.25,11.4) 106(-7.75,11.4) 107(-8.25,11.4) 108(-8.75,11.4)
  rect 2x0.25 smd mask+0.05: 37(11.4,-8.75) 38(11.4,-8.25) 39(11.4,-7.75) 40(11.4,-7.25) 41(11.4,-6.75) 42(11.4,-6.25) 43(11.4,-5.75) 44(11.4,-5.25) 45(11.4,-4.75) 46(11.4,-4.25) 47(11.4,-3.75) 48(11.4,-3.25) 49(11.4,-2.75) 50(11.4,-2.25) 51(11.4,-1.75) 52(11.4,-1.25) 53(11.4,-0.75) 54(11.4,-0.25) 55(11.4,0.25) 56(11.4,0.75) 57(11.4,1.25) 58(11.4,1.75) 59(11.4,2.25) 60(11.4,2.75) 61(11.4,3.25) 62(11.4,3.75) 63(11.4,4.25) 64(11.4,4.75) 65(11.4,5.25) 66(11.4,5.75) 67(11.4,6.25) 68(11.4,6.75) 69(11.4,7.25) 70(11.4,7.75) 71(11.4,8.25) 72(11.4,8.75) 109(-11.4,8.75) 110(-11.4,8.25) 111(-11.4,7.75) 112(-11.4,7.25) 113(-11.4,6.75) 114(-11.4,6.25) 115(-11.4,5.75) 116(-11.4,5.25) 117(-11.4,4.75) 118(-11.4,4.25) 119(-11.4,3.75) 120(-11.4,3.25) 121(-11.4,2.75) 122(-11.4,2.25) 123(-11.4,1.75) 124(-11.4,1.25) 125(-11.4,0.75) 126(-11.4,0.25) 127(-11.4,-0.25) 128(-11.4,-0.75) 129(-11.4,-1.25) 130(-11.4,-1.75) 131(-11.4,-2.25) 132(-11.4,-2.75) 133(-11.4,-3.25) 134(-11.4,-3.75) 135(-11.4,-4.25) 136(-11.4,-4.75) 137(-11.4,-5.25) 138(-11.4,-5.75) 139(-11.4,-6.25) 140(-11.4,-6.75) 141(-11.4,-7.25) 142(-11.4,-7.75) 143(-11.4,-8.25) 144(-11.4,-8.75)
  silkscreen extent -12.4,-12.4 12.4,12.4, body extent -11,-11 11,11, height 2
MSOP-10 [mm]
  rect 1.5x0.3 smd mask+0.05: 1(-2.5,1)
  oval 1.5x0.3 smd mask+0.05: 2(-2.5,0.5) 3(-2.5,0) 4(-2.5,-0.5) 5(-2.5,-1) 6(2.5,-1) 7(2.5,-0.5) 8(2.5,0) 9(2.5,0.5) 10(2.5,1)
  silkscreen extent -1.25,-1.28 1.25,1.33, body extent -2.51,-1.5 2.51,1.5, height 1.05
PB-03F [mm]
  rect 1.5x1 smd paste+0 mask+0.05: 1(-8,7.75) 2(-8,5.75) 3(-8,3.75) 4(-8,1.75) 5(-8,-0.25) 6(-8,-2.25) 7(-8,-4.25) 8(-8,-6.25) 15(8,-6.25) 16(8,-4.25) 17(8,-2.25) 18(8,-0.25) 19(8,1.75) 20(8,3.75) 21(8,5.75) 22(8,7.75)
  rect 1x1.5 smd paste+0 mask+0.05: 9(-5,-7.75) 10(-3,-7.75) 11(-1,-7.75) 12(1,-7.75) 13(3,-7.75) 14(5,-7.75)
  silkscreen extent -8,-7.75 8,16.25
SOD-123 [mm]
  rect 0.9x1.2 smd: 1(1.775,0) 2(-1.775,0)
  silkscreen extent -2.4,-0.92 2.4,0.92, body extent -1.85,-0.8 1.85,0.8, height 1.27
SOD-323 [mm]
  rect 0.9x1.2 smd: 1(1.3,0) 2(-1.3,0)
  silkscreen extent -1.97,-0.82 1.97,0.82, body extent -1.3,-0.67 1.3,0.68, height 1.1
SOIC-8W [mil]
  rect 87x24 smd: 1(-146.75,75) 2(-146.75,25) 3(-146.75,-25) 4(-146.75,-75) 5(146.75,-75) 6(146.75,-25) 7(146.75,25) 8(146.75,75)
  silkscreen extent -72,-92 70,94, body extent -158,-108 159,107, height 85
SOT23-6 [mm]
  rrect50% 1.27x0.55 smd paste+0.038 mask+0.038: 1(-1.075,0.95) 2(-1.075,0) 3(-1.075,-0.95) 4(1.075,-0.95) 5(1.075,0) 6(1.075,0.95)
  silkscreen extent -1.35,-1.55 0.9,1.57, body extent -1.4,-1.45 1.4,1.45, height 1.45
SOT-23 [mm]
  rect 0.6x1.45 smd: 1(-0.95,-1.175) 2(0.95,-1.175) 3(0,1.175)
  silkscreen extent -1.92,-1.3 1.5,0.7, body extent -1.45,-1.23 1.45,1.07, height 1
SOT-223&TO-252 [mm]
  rect 1x2.4 smd: 1(-2.285,-3.319) 2(0.001,-3.319) 3(2.285,-3.319)
  rect 5.5x5.7 smd: 4(0,4.081)
  silkscreen extent -3.09,-4.02 3.09,6.83
SOT-223N [mm]
  rect 1x2.4 smd: 1(-2.3,-2.9) 2(0,-2.9) 3(2.3,-2.9)
  rect 3.3x2.4 smd: 4(0,2.9)
  silkscreen extent -3.47,-3.02 3.35,1.4, body extent -3.24,-3.49 3.24,3.49, height 1.64
TSOP2-54_M [mm] "SOP, 54-Leads, Body 22.2x10.16mm, Pitch 0.8mm, IPC Low Density"
  oval 1.8x0.6 smd: 1(-5.7,10.4) 2(-5.7,9.6) 3(-5.7,8.8) 4(-5.7,8) 5(-5.7,7.2) 6(-5.7,6.4) 7(-5.7,5.6) 8(-5.7,4.8) 9(-5.7,4) 10(-5.7,3.2) 11(-5.7,2.4) 12(-5.7,1.6) 13(-5.7,0.8) 14(-5.7,0) 15(-5.7,-0.8) 16(-5.7,-1.6) 17(-5.7,-2.4) 18(-5.7,-3.2) 19(-5.7,-4) 20(-5.7,-4.8) 21(-5.7,-5.6) 22(-5.7,-6.4) 23(-5.7,-7.2) 24(-5.7,-8) 25(-5.7,-8.8) 26(-5.7,-9.6) 27(-5.7,-10.4) 28(5.7,-10.4) 29(5.7,-9.6) 30(5.7,-8.8) 31(5.7,-8) 32(5.7,-7.2) 33(5.7,-6.4) 34(5.7,-5.6) 35(5.7,-4.8) 36(5.7,-4) 37(5.7,-3.2) 38(5.7,-2.4) 39(5.7,-1.6) 40(5.7,-0.8) 41(5.7,0) 42(5.7,0.8) 43(5.7,1.6) 44(5.7,2.4) 45(5.7,3.2) 46(5.7,4) 47(5.7,4.8) 48(5.7,5.6) 49(5.7,6.4) 50(5.7,7.2) 51(5.7,8) 52(5.7,8.8) 53(5.7,9.6) 54(5.7,10.4)
  silkscreen extent -5.82,-11.15 4.4,11.37, body extent -5.12,-11.15 5.12,11.15, height 1.2
"Xtal 2p" [mil]
  round 55 hole 25: 1(96.06,0) 2(-96.06,0)
  silkscreen extent -225,-85 225,85, body extent -226,-89 226,89, height 140

## Part data
BZ1: library part "Buzzer New"
C1 C2 C3 C4 C5 C6 C7 C8 C9 C10 C11 C12 C13 C14 C15 C16 C17 C18 C19 C20 C21 C22 C24 C25 C26 C27 C28 C29 C30 C31 C32 C33 C34 C35 C36 C37 C38 C39 C40 C41 C42 C43 C44 C45 C46 C47 C50 C51 C52 C53 C54 C55 C57: library part "Capacitor SMD"
  C11: Revision="July-2002: Re-released for DXP Platform."
C23 C56: library part "Cap pol$", Device Code=124112
D1 D3 D6: library part 1N5819(SS14)
D4 D5: library part BZT52C3V3
L1: library part "Inductor SMT"
L2 L4: library part Inductor, "Inductor", Code_IEC=1005, Code_JEITA=0402, LatestRevisionDate=29-May-2009, LatestRevisionNote="IPC-7351 Footprint Added.", PackageDescription="Chip Inductor", PackageReference=0402-A, Published=8-Jun-2000, Publisher="Altium Limited"
LED1 LED3: library part "LED SMD"
LED2 LED4: library part LED$
NTC1: library part "NTC power", "NTC , 50R-13mm disc type", Device Code=143161
P1 P2 P3 P8 P9 P12: library part Connector2$, "Connector, 2Pin", Device Code=1111111
P4 P7: "Header, 6-Pin", LatestRevisionDate=17-Jul-2002, LatestRevisionNote="Re-released for DXP Platform.", Publisher="Altium Limited"
P5 P11: "Header, 5-Pin", LatestRevisionDate=17-Jul-2002, LatestRevisionNote="Re-released for DXP Platform.", Publisher="Altium Limited"
P6: library part "Header 4", "Header, 4-Pin", LatestRevisionDate=17-Jul-2002, LatestRevisionNote="Re-released for DXP Platform.", Publisher="Altium Limited"
P10: library part Connector3$, "Connector, 3Pin", Device Code=1111111
Q1 Q2 Q3: library part PMBT2222A
R1 R2 R3 R4 R5 R6 R7 R8 R9 R10 R11 R12 R13 R14 R15 R16 R17 R18 R19 R20 R21 R22 R23 R24 R25 R26 R27 R28 R29 R30 R31 R32 R33 R34 R35 R36 R37 R38 R40 R41 R42 R43 R44 R45 R46 R47 R48 R49 R50 R51 R52 R53: library part "Resistor SMD"
S1: library part "4 Pin 1mm FPC"
U2: "256Mb Synchronous High-Speed CMOS DRAM, 16Mb x 16Bit x 4 Banks, 54-Pin TSOP Pb-free, Commercial", Code_JEDEC=MS-024-FA, ColumnAddress="512 (A0-A8)", ComponentLink1Description="Manufacturer Link", ComponentLink1URL=http://www.micron.com, ComponentLink2Description=Datasheet, ComponentLink2URL=http://download.micron.com/pdf/datasheets/dram/sdram/256MSDRAM.pdf, CycleTime="7.5ns @ CL = 3 (PC133)", DatasheetVersion="RevL, Oct-2007", LatestRevisionDate=13-Apr-2006, LatestRevisionNote="IPC-7351 Footprint Added.", PackageDescription="54-Pin Plastic Small Outline Package 0.8 mm Pitch", PackageReference=TSOP2-54, PackageVersion=Sep-2003, Published=11-Oct-2004, Publisher="Altium Limited", RowAddress="8K (A0-A12)"
U4: "Integrated Circuit", Manufacturer_Name=NSIWAY, Datasheet Link=https://datasheet.lcsc.com/lcsc/1810181630_Shenzhen-Nsiway-Tech-NS2009_C219024.pdf, Height=1.12mm, Manufacturer_Part_Number=NS2009
U5: library part MP3202
U6 U7: library part LM1117IMP-x.x, "x.x Volt, 800mA Low-Dropout Linear Regulator, 4-pin SOT-223", Manufacturer="National Semiconductor", PackageTopMarking=XYTT*N05B, PartNumber=LM1117IMP-3.3, PowerWise=N, Supplier Part Number 1=7614123, Code_IPC=SOT223-4, Code_JEDEC=TO-261-AA, ComponentLink1Description="LM1117 Datasheet", ComponentLink1URL=http://www.national.com/ds/LM/LM1117.pdf, ComponentLink2Description="LM1117 Web Page", ComponentLink2URL=http://www.national.com/pf/LM/LM1117.html, ComponentLink3Description="MP04A Package Page", ComponentLink3URL=http://www.national.com/packaging/folders/mp04a.html, CompType="LDO IC", DatasheetVersion=Apr-2006, PackageDescription="Molded SOT-223, 6.50 x 3.56 x 1.6mm Body, 4 Lead, 2.3mm Pitch", PackageReference=MP04A, PackageVersion="revB, Apr-2003", PinCount=4, Published=4-Dec-2008, Publisher="Altium Limited", RoHS=N, Supplier 1=Farnell
U8: Mfr_Name=Ai-Thinker, C="Copyright (C) 2024 Accelerated Designs. All rights reserved", Copyright="Copyright (C) 2024 Ultra Librarian. All rights reserved.", Manufacturer_Part_Number=PB-03F
Y1: library part Xtal

## Free pads (board coordinates)
  round 5 hole 3: 2(97.053,96.977) 3(3.124,97.003) 4(3.048,2.845) 5(97.307,2.946)

## Via types
v1: diameter 0.8, hole 0.4, Top Layer to Bottom Layer, 179 vias
v2: diameter 0.8, hole 0.4, Top Layer to Bottom Layer, tented both sides, 16 vias

## Nets (pads, with @x,y where several pads share a name; then routed paths per layer and width w, separated by ;. In a path a pad name is that pad's centre, name@x,y a point inside that pad or via, vN(x,y) a via of type N, cw(c..) or ccw(c..) an arc to the next point about the centre after c; other vN are vias at no path point)
3V3: C1.2 C2.1 C3.2 C4.2 C5.2 C6.2 C7.2 C8.2 C9.2 C10.1 C11.1 C13.2 C15.2 C28.2 C29.2 C30.2 C31.2 C32.2 C35.2 C36.2 C37.2 C38.2 C39.2 C52.2 C54.2 C55.2 FPC1.2 FPC2.7 L2.1 P6.1 P10.3 R1.1 R2.1 R3.1 R4.1 R5.1 R6.1 R7.1 R8.1 R11.1 R17.1 R18.1 R24.2 R26.1 R34.1 R38.1 R41.1 R42.1 R45.1 R46.1 R47.1 R48.1 U1.17 U1.30 U1.39 U1.52 U1.62 U1.72 U1.84 U1.95 U1.108 U1.121 U1.131 U1.144 U2.1 U2.3 U2.9 U2.14 U2.27 U2.43 U2.49 U3.8 U4.1 U7.2 U7.4 U8.8 | length 685.9
  Top Layer w0.254: U3.8@26.041,24.504 26.041,21.043 27.051,20.034 27.635,20.034 ; v1(27.635,21.431) 27.635,20.034 ; v1(27.686,30.575) 28.88,31.768 R26.1@28.88,32.962 28.88,34.537 29.147,34.804 U1.144@30.815,34.804 32.906,34.804 33.223,35.121 v1(33.223,36.264) ; C10.1@29.159,22.955 29.185,22.93 R5.1@29.185,21.38 29.185,20.059 29.159,20.034 ; U1.131@30.815,41.304 32.349,41.304 v1(33.35,40.303) ; U1.121@30.815,46.304 32.581,46.304 v1(33.401,45.484) ; C37.2@31.064,56.838 32.842,56.838 33.463,56.218 33.463,54.956 U1.108@33.465,54.954 v1(33.465,51.161) ; R8.1@33.503,21.278 33.477,21.253 33.477,20.516 32.995,20.034 29.159,20.034 ; v1(37.592,74.676) 38.92,74.676 R7.1@38.938,74.694 ; v1(38.456,52.444) 39.599,52.444 39.965,52.81 U1.95@39.965,54.954 ; R7.1@38.932,74.675 C2.1@40.329,76.072 ; C2.1@40.259,76.142 C2.1@40.278,76.123 ; C2.1@40.3,76.101 C2.1@40.278,76.123 ; FPC2.7@40.727,78.888 FPC2.7@40.736,78.896 ; C2.1@40.736,76.269 C2.1@40.736,76.523 ; FPC2.7@40.736,78.642 C2.1@40.736,76.523 ; v1@42.545,34.842 v1(42.342,34.842) 41.783,34.842 41.465,34.524 U1.17@41.465,32.154 41.467,32.152 41.467,31.065 42.596,29.936 42.596,28.772 C35.2@43.155,28.213 ; v1(44.425,52.444) 45.187,52.444 45.463,52.72 45.463,54.952 U1.84@45.465,54.954 ; v1(46.431,48.075) 50.66,52.304 U1.72@53.615,52.304 ; v1@47.549,34.773 47.6,34.773 47.965,34.407 U1.30@47.965,32.154 ; v1(50.978,48.99) 50.978,47.872 51.546,47.304 U1.62@53.615,47.304 ; v1(51.054,43.91) 51.054,43.148 51.898,42.304 U1.52@53.615,42.304 ; v1(51.079,36.493) 51.156,36.493 51.844,35.804 U1.39@53.615,35.804 55.223,35.804 55.626,35.401 57.36,35.401 57.785,34.976 57.785,27.813 57.422,27.45 54.457,27.45 L2.1@54.331,27.323 ; R24.2@58.75,73.069 58.75,70.834 59.69,69.894 v1@61.214,69.894 ; U2.1@60.263,39.429 60.263,38.082 60.082,37.901 60.082,36.202 60.274,36.01 C8.2@60.96,36.01 ; U2.3@61.863,39.429 U2.3@61.863,39.429 61.861,36.01 v1(62.382,36.01) ; R17.1@61.874,73.069 62.649,73.069 ; v1@62.687,71.85 62.687,73.031 62.649,73.069 ; R11.1@63.424,73.069 62.649,73.069 ; C3.2@63.856,53.155 C3.2@63.881,53.181 ; C3.2@63.881,53.155 64.263,52.774 U2.49@64.263,50.829 U2.49@64.287,50.853 ; C6.2@66.181,35.654 66.461,35.934 66.461,37.879 66.663,38.081 U2.9@66.663,39.429 ; C4.2@68.656,53.257 C4.2@68.694,53.257 ; U2.43@69.063,50.829 69.063,52.889 C4.2@68.694,53.257 ; v1(69.774,53.231) 69.748,53.257 C4.2@68.694,53.257 ; C5.2@70.587,35.655 70.625,35.655 70.904,35.934 70.904,35.972 71.196,36.264 71.196,37.688 70.729,38.155 70.729,39.363 U2.14@70.663,39.429 ; R4.1@75.362,71.342 R4.1@75.387,71.316 ; v1@81.057,36.041 81.057,39.423 U2.27@81.063,39.429 ; 27.635,20.034 29.159,20.034 ; C2.1@40.278,76.123 40.399,76.244 40.457,76.244 C2.1@40.736,76.523
  Top Layer w0.3: C11.1@24.74,72.459 24.74,73.501 25.086,73.847 U4.1@26.706,73.847 28.355,73.847 v1(29.223,74.714) ; C8.2@60.96,36.01 61.861,36.01 ; C3.2@63.881,53.181 v1(64.999,53.181) ; C6.2@66.218,35.604 66.218,33.274 v1(66.294,33.274) 70.009,33.274 70.587,33.851 C5.2@70.587,35.655 ; R2.1@68.605,71.342 R3.1@74.168,71.342 ; 69.596,71.367 69.596,75.533 71.161,77.097 FPC1.2@71.161,78.857 ; R3.1@73.812,71.316 75.336,71.316 R4.1@75.362,71.342 ; C28.2@91.455,51.765 91.48,51.791 93.015,51.791 R47.1@93.04,51.816
  Top Layer w0.4: R38.1@5.385,44.856 5.397,44.869 6.871,44.869 v1(6.883,44.882) ; C52.2@8.509,30.226 8.509,32.055 P6.1@8.941,32.487 ; v1(12.04,9.83) 15.011,9.83 15.087,9.906 ; R1.1@12.065,61.925 12.09,61.951 v1(13.487,61.951) ; C55.2@15.088,9.22 15.087,9.906 ; U8.8@15.087,12.342 15.087,9.906 ; v1(24.917,14.275) 24.943,14.249 v1(33.731,14.249) ; v1@25.044,14.021 v1@25.108,14.084 ; R41.1@55.397,14.961 v1(56.718,14.961) R42.1@58.014,14.961 ; v1(68.555,69.894) R2.1@68.555,71.291 ; C29.2@91.44,53.112 91.447,53.104 91.447,51.772 C28.2@91.455,51.765 91.455,50.386 92.336,49.505 U7.4@92.413,49.428
  Top Layer w0.5: v1(89.967,49.505) U7.4@92.336,49.505 ; U7.4@92.413,49.428 92.643,49.428 U7.4@92.685,49.386 U7.2@92.685,43.586
  Bottom Layer w0.254: v1@27.661,21.431 v1@27.661,30.575 ; v1(33.35,40.303) 37.541,40.303 37.846,39.998 ; v1(33.401,45.484) 37.795,45.484 37.846,45.434 37.973,45.434 ; 37.846,47.389 37.846,47.44 37.846,48.126 ; 38.456,48.101 v1(38.456,52.444) C31.2@39.497,52.444 ; C9.2@41.25,34.816 41.275,34.842 v1(42.342,34.842) 42.342,36.29 ; 42.164,39.109 42.342,38.931 42.342,36.29 ; R18.1@43.942,36.315 R18.1@43.688,36.315 42.367,36.315 42.342,36.29 ; 44.425,48.151 v1(44.425,52.444) 45.669,52.444 C36.2@45.694,52.47 ; 45.822,39.211 45.974,39.211 47.549,37.636 v1(47.549,34.798) ; 46.431,39.896 49.073,39.896 51.079,37.89 v1(51.079,36.493) ; v1(46.431,48.075) 47.346,48.99 v1(50.978,48.99) 50.978,47.796 C39.2@51.054,47.72 ; 46.457,43.91 v1(51.054,43.91) 51.054,42.792 C30.2@51.13,42.716 ; v1(62.382,36.01) 63.246,36.01 63.779,36.544 63.779,51.961 v1(64.999,53.181) 65.024,53.206 69.748,53.206 v1(69.774,53.231) ; C7.2@78.156,44.57 78.156,44.532 78.435,44.252 78.473,44.252 78.892,43.833 80.594,43.833 81.102,43.325
  Bottom Layer w0.3: v1(6.883,44.882) 12.065,44.882 ; v1(33.35,40.303) 33.376,40.328 33.376,41.37 C38.2@33.401,41.395 ; v1(33.465,51.161) 34.811,51.161 37.846,48.126 ; v1(81.102,36.036) 85.623,36.036
  Bottom Layer w0.35: 60.071,69.894 61.265,69.894 v1@68.504,69.894 ; 60.071,71.85 v1@62.662,71.85
  Bottom Layer w0.4: P6.1@8.941,32.487 12.065,32.487 ; 12.065,61.976 12.09,61.951 v1(13.487,61.951) ; 13.322,64.808 25.654,77.14 41.758,77.14 ; R45.1@20.879,14.275 R46.1@23.368,14.275 v1(24.917,14.275) ; v1(29.223,74.714) 29.242,74.695 37.573,74.695 v1(37.592,74.676) 40.056,74.676 41.808,76.429 41.808,84.353 42.799,85.344 52.121,85.344 60.071,77.394 60.071,71.85 60.071,69.894 ; v1(33.401,45.484) 33.414,45.497 33.414,46.615 C15.2@33.426,46.627 ; v1(33.731,14.249) 56.693,14.249 ; v1(51.079,36.493) 51.079,33.096 52.052,32.124 P10.3@60.935,32.124 P10.3@60.935,32.258 ; v1(56.718,14.961) 56.693,14.935 56.693,14.249 ; v1(62.382,36.01) 61.417,36.01 60.935,35.528 P10.3@60.935,32.258 ; v1@62.662,71.85 v1(62.687,71.824) ; v1(66.294,33.274) 66.294,32.258 ; v1(68.555,69.894) 69.614,68.834 78.359,68.834 85.623,61.57 85.623,49.505 85.623,43.325 85.623,36.036 85.623,25.578 ; R34.1@77.953,23.343 77.953,24.387 79.143,25.578 85.623,25.578 ; 81.102,43.325 85.598,43.325 ; 85.573,32.258 66.294,32.258 ; 56.693,14.249 57.76,14.249 73.406,14.249 76.632,14.249 85.623,23.241 85.623,25.578 ; P10.3@60.935,32.258 66.294,32.258
  Bottom Layer w0.5: v1(12.04,9.83) 12.065,9.855 12.065,32.487 12.065,44.882 12.065,61.976 12.065,63.551 13.322,64.808 ; v1(33.223,36.264) 36.246,36.264 39.002,39.02 ; 85.7,49.505 v1(89.967,49.505)
  Bottom Layer w1.2: 37.846,47.389 37.846,45.434 37.846,39.998 38.735,39.109 42.164,39.109 45.593,39.109 46.431,39.947 v1(46.431,48.075) ; 37.846,47.44 38.557,48.151 44.399,48.151
  other v1: 61.265,69.868
12V: BZ1.1 C23.1 C24.2 C25.2 D2.2 D3.2 P3.1 R33.2 R49.2 R53.1 U6.3 | length 223.6
  Top Layer w0.5: R33.2@2.388,57.252 2.388,62.128 0.762,63.754 0.762,76.031 BZ1.1@2.499,77.768 ; 2.388,58.889 2.68,59.182 6.198,59.182 8.204,57.175 v1(13.462,57.175) ; P3.1@4.953,88.9 4.923,88.87 D2.2@4.923,84.905 4.923,80.192 BZ1.1@2.499,77.768 ; R49.2@12.7,69.088 12.7,72.009 6.941,77.768 BZ1.1@2.499,77.768 ; C25.2@91.908,19.558 91.945,19.595 94.716,19.595 ; C23.1@92.1,10.947 C25.2@92.1,19.366 ; C24.2@92.508,17.274 C24.2@92.583,17.348 ; U6.3@94.716,27.263 94.716,19.595 ; D3.2@96.342,19.25 95.997,19.595 94.716,19.595
  Bottom Layer w0.5: v1(13.462,57.175) 13.462,2.565 14.503,1.524 89.052,1.524 91.923,4.394 91.923,10.897 C23.1@91.948,10.922
+5V: C16.2 C26.2 C27.2 C51.2 C53.2 C56.1 L1.1 P4.6 P5.5 P7.6 P11.5 R53.2 U5.6 U6.2 U6.4 U7.3 | length 160.8
  Top Layer w0.3: L1.1@94.031,72.629 L1.1@94.036,72.624
  Top Layer w0.4: U6.2@92.442,27.146 U6.2@92.559,27.263 ; U5.6@94.036,65.124 C16.2@96.819,65.124
  Top Layer w0.5: v1(28.473,3.581) P11.5@28.473,7.061 ; C53.2@46.722,9.855 46.894,9.683 46.894,7.233 P7.6@47.066,7.061 v1(47.066,3.683) ; P5.5@63.094,7.061 63.138,7.017 63.138,3.759 v1(76.657,3.759) ; C51.2@81.113,9.814 81.509,9.419 81.509,7.214 P4.6@81.661,7.061 v1(81.661,3.81) ; C56.1@92.354,23.165 92.393,23.203 92.393,27.224 U6.2@92.432,27.263 92.432,35.392 92.162,35.662 C26.2@92.162,40.767 94.115,40.767 94.985,41.636 U7.3@94.985,43.586 95.061,43.51 95.188,43.637 v1(97.053,43.637) ; L1.1@94.61,72.713 97.028,72.713 C16.2@97.028,65.322
  Bottom Layer w0.5: v1(28.473,3.581) 28.524,3.632 47.015,3.632 v1(47.066,3.683) 47.092,3.708 63.195,3.708 v1(63.221,3.734) ; v1(76.657,3.759) 76.683,3.785 81.636,3.785 v1(81.661,3.81) ; P4.6@81.661,7.061 82.88,7.061 92.304,16.485 C56.1@92.304,23.165 ; v1(97.053,43.637) v1(97.053,72.72)
AVDD: C46.1 C47.1 D6.2 DS2.1 FPC2.43 R30.1 | length 63.4
  Top Layer w0.3: FPC2.43@58.736,78.896 58.736,81.691 v1(59.284,82.238) v1@59.334,82.289 ; v1@59.251,87.96 v1@59.258,87.96 ; R30.1@93.523,81.451 93.624,81.349 C47.1@95.022,81.349 ; C46.1@95.003,79.985 C46.1@95.022,80.003
  Top Layer w0.35: v1@59.258,87.96 88.138,87.96 91.694,84.404 91.694,82.06 92.304,81.451 R30.1@93.523,81.451
  Top Layer w0.4: DS2.1@87.945,76.562 87.945,79.284 88.646,79.985 C46.1@95.003,79.985 ; D6.2@94.586,77.59 95.022,78.026 C46.1@95.022,80.003 C47.1@95.022,81.349
  Bottom Layer w0.3: v1(59.258,88.062) 59.271,88.049 59.271,82.251 v1(59.284,82.238)
BGND: C16.1 C19.2 C42.1 C43.1 C44.1 C45.2 C46.2 C47.2 C57.2 D4.1 D5.2 DS1.2 L4.1 R13.2 R14.2 R32.2 R43.2 R52.1 U5.2 | length 80.8
  Top Layer w0.35: R14.2@89.992,64.865 89.992,64.827 90.64,64.179 U5.2@91.881,64.179 U5.2@91.781,64.279
  Top Layer w0.4: C19.2@86.436,61.29 86.436,62.386 C43.1@86.738,62.687 ; C19.2@86.462,61.29 R43.2@86.462,60.02 88.014,60.02 ; C44.1@86.589,80.446 86.538,80.497 R52.1@86.538,83.185 88.538,83.185 ; C43.1@86.766,62.716 C43.1@86.738,62.687 ; 87.97,60.064 88.014,60.02 ; DS1.2@87.97,66.502 87.97,64.795 ; D5.2@88.465,58.369 88.465,60.02 88.014,60.02 ; v1(88.494,82.144) 88.538,82.188 88.538,83.185 ; D4.1@88.538,84.887 88.538,83.185 ; R14.2@89.992,64.865 88.04,64.865 87.97,64.795 ; C57.2@96.571,84.397 96.558,84.385 96.558,82.2 ; v1(97.663,82.169) 97.632,82.2 96.558,82.2 ; L4.1@98.374,60.115 98.374,65.068 C16.1@98.425,65.118 98.425,78.162 96.584,80.003 C46.2@96.546,80.003 96.558,80.016 96.558,82.2 ; C43.1@86.738,62.687 87.655,62.687 87.97,63.002 87.97,64.795
  Bottom Layer w0.4: v1@88.494,60.122 v1(88.494,82.144) 88.519,82.169 v1(97.663,82.169)
  other v1: 88.468,60.122
BMP_INT1: P4.2 U1.135 | length 84.6
  Top Layer w0.254: v1(24.054,38.322) 26.111,38.322 27.096,39.306 30.813,39.306 U1.135@30.815,39.304
  Bottom Layer w0.254: 21.59,38.322 v1(24.054,38.322)
  Bottom Layer w0.35: 21.59,38.322 20.803,37.534 20.803,22.835 32.36,11.278 70.51,11.278 71.501,10.287
  Bottom Layer w0.5: P4.2@71.501,7.061 71.501,10.287
BMP_INT2: P5.1 U1.134 | length 68.3
  Top Layer w0.254: v1@24.968,39.338 26.238,39.338 26.705,39.804 U1.134@30.815,39.804
  Bottom Layer w0.254: 21.057,39.338 v1@24.968,39.338
  Bottom Layer w0.35: 21.057,39.338 19.888,38.169 19.888,22.454 31.928,10.414 52.324,10.414 52.934,9.804
  Bottom Layer w0.5: P5.1@52.934,7.061 52.934,9.804
  other v1: 24.968,39.363
BMP_INT3: P7.2 U1.133 | length 53.1
  Top Layer w0.254: v1(24.028,40.303) 24.03,40.304 U1.133@30.815,40.304 ; v1@24.028,40.481 v1@24.079,40.43
  Bottom Layer w0.254: 20.396,40.252 v1@23.927,40.252 ; v1@23.927,40.379 v1@24.028,40.481
  Bottom Layer w0.35: 20.396,40.252 19.126,38.982 19.126,22.098 31.572,9.652 36.195,9.652 36.906,8.941
  Bottom Layer w0.5: 36.906,8.306 36.906,8.941
BMP_INT4: P11.1 U1.119 | length 50.9
  Top Layer w0.254: v1@28.321,46.678 28.321,46.78 28.845,47.304 U1.119@30.815,47.304
  Bottom Layer w0.254: 19.653,42.284 26.924,42.284 28.346,43.706 v1(28.346,46.754)
  Bottom Layer w0.35: 18.313,11.836 18.313,40.945 19.653,42.284
  Bottom Layer w0.5: P11.1@18.313,7.061 18.313,11.836
Buzzer: R22.1 U1.82 | length 47.3
  Top Layer w0.254: v1(45.949,57.829) 46.465,57.313 U1.82@46.465,54.954
  Top Layer w0.3: R22.1@16.129,71.247 16.167,71.247 16.424,70.991 16.424,70.952 17.653,69.723 17.653,63.119 18.796,61.976 v2(18.796,57.531)
  Bottom Layer w0.254: v2(18.796,57.531) 21.311,55.016 43.136,55.016 v1(45.949,57.829)
CS: R8.2 U1.3 U3.1 | length 20.6
  Top Layer w0.254: v1@29.235,24.555 v1(29.235,24.58) 29.235,27.247 31.166,29.178 33.96,29.178 34.465,29.683 U1.3@34.465,32.154 ; R8.2@33.503,22.802 33.503,24.498 U3.1@33.496,24.504 v1(35.077,24.504)
  Bottom Layer w0.254: v1(29.235,24.58) 29.273,24.542 35.039,24.542 v1(35.077,24.504)
Dimmer: C42.2 R12.1 R13.1 U5.4 | length 5.9
  Top Layer w0.35: U5.4@94.031,63.229 R13.1@96.835,63.229
  Top Layer w0.4: R12.1@95.326,61.537 95.377,61.588 96.799,61.588 C42.2@96.85,61.639 ; C42.2@96.901,61.69 R13.1@96.901,63.214
FMC_A0: U1.10 U2.23 | length 79.4
  Top Layer w0.254: U1.10@37.965,32.154 37.965,30.617 36.449,29.101 36.449,22.294 37.744,20.999 72.789,20.999 83.007,31.217 83.007,41.319 82.372,41.954 78.715,41.954 77.863,41.102 U2.23@77.863,39.429
FMC_A1: U1.11 U2.24 | length 75.5
  Top Layer w0.254: U1.11@38.465,32.154 38.465,30.431 36.903,28.87 36.903,22.602 37.948,21.558 72.383,21.558 82.499,31.674 82.499,41.039 82.067,41.471 79.324,41.471 78.663,40.81 U2.24@78.663,39.429
FMC_A2: U1.12 U2.25 | length 71.5
  Top Layer w0.254: U1.12@38.965,32.154 38.965,30.22 37.414,28.67 37.414,22.733 38.056,22.091 71.958,22.091 81.991,32.124 81.991,40.633 81.7,40.924 79.768,40.924 79.463,40.619 U2.25@79.463,39.429
FMC_A3: U1.13 U2.26 | length 63.8
  Top Layer w0.254: U1.13@39.465,32.154 39.465,29.984 37.973,28.492 37.973,23.132 38.481,22.624 71.476,22.624 80.263,31.412 U2.26@80.263,39.429
FMC_A4: U1.14 U2.29 | length 89.4
  Top Layer w0.254: v1(36.474,19.856) 37.113,19.218 40.637,19.218 41.275,19.856 73.602,19.856 84.023,30.277 84.023,43.427 80.263,47.187 U2.29@80.263,50.829 ; v1@39.965,29 U1.14@39.965,32.154
  Bottom Layer w0.254: v1@36.449,19.932 36.449,27.781 37.44,28.771 39.751,28.771 v1@39.903,28.924
  other v1: 39.903,29
FMC_A5: U1.15 U2.30 | length 87.6
  Top Layer w0.254: v1@38.557,20.135 38.608,20.084 40.386,20.084 40.742,20.44 73.196,20.44 83.569,30.813 83.569,42.992 79.463,47.098 U2.30@79.463,50.829 ; U1.15@40.465,32.154 40.465,30.14 v1@41.046,29.559
  Bottom Layer w0.254: v1@38.557,20.084 37.084,21.558 37.084,27.298 37.922,28.136 40.538,28.136 40.996,28.593 40.996,29.381 v1@41.326,29.711
  other v1: 38.557,20.11 40.996,29.584
FMC_A6: U1.50 U2.31 | length 32.4
  Top Layer w0.254: U1.50@53.615,41.304 74.991,41.304 78.663,44.975 U2.31@78.663,50.829
FMC_A7: U1.53 U2.32 | length 31.9
  Top Layer w0.254: U1.53@53.615,42.804 54.928,42.804 55.956,41.776 74.72,41.776 77.863,44.919 U2.32@77.863,50.829
FMC_A8: U1.54 U2.33 | length 30.8
  Top Layer w0.254: U1.54@53.615,43.304 55.114,43.304 56.134,42.284 74.39,42.284 77.063,44.957 U2.33@77.063,50.829
FMC_A9: U1.55 U2.34 | length 29.9
  Top Layer w0.254: U1.55@53.615,43.804 55.3,43.804 56.312,42.792 74.162,42.792 76.263,44.893 U2.34@76.263,50.829
FMC_A10: U1.56 U2.22 | length 33
  Top Layer w0.254: U1.56@53.615,44.304 55.453,44.304 56.435,43.322 73.504,43.322 v1@75.048,44.866 ; U2.22@77.063,39.429 77.063,40.944 78.962,42.843 79.502,42.843 v1@79.705,43.046
  Bottom Layer w0.254: v1(75.057,44.856) 76.867,43.046 v1@79.832,43.046
  other v1: 79.832,42.868
FMC_A11: U1.57 U2.35 | length 27.7
  Top Layer w0.254: U1.57@53.615,44.804 55.595,44.804 56.623,43.776 72.688,43.776 75.463,46.551 U2.35@75.463,50.829
FMC_A12: U1.87 U2.36 | length 44.3
  Top Layer w0.254: U1.87@43.965,54.954 43.965,60.544 44.363,60.942 70.725,60.942 74.663,57.004 U2.36@74.663,50.829
FMC_BA0: U1.89 U2.20 | length 67.7
  Top Layer w0.254: U1.89@42.965,54.954 42.965,60.484 43.917,61.436 74.073,61.436 83.464,52.045 v1(83.464,48.278) ; U2.20@75.463,39.429 75.463,40.988 79.578,45.103 v1(79.578,45.713)
  Bottom Layer w0.254: v1(79.578,45.713) 82.118,45.713 83.464,47.059 v1(83.464,48.278)